# Altium PCB Main_PCB_v1.1.PcbDoc (part 2 of 2)
Units mil, origin at the board's own origin, x right, y up, seen from the top; angles counter-clockwise.
Board outline 2165.35 x 2283.47 mil, 2 copper layers (Top Layer, Bottom Layer), stack 61.811 mil thick; 55 components, 34 nets, 241 pads, 63 vias.
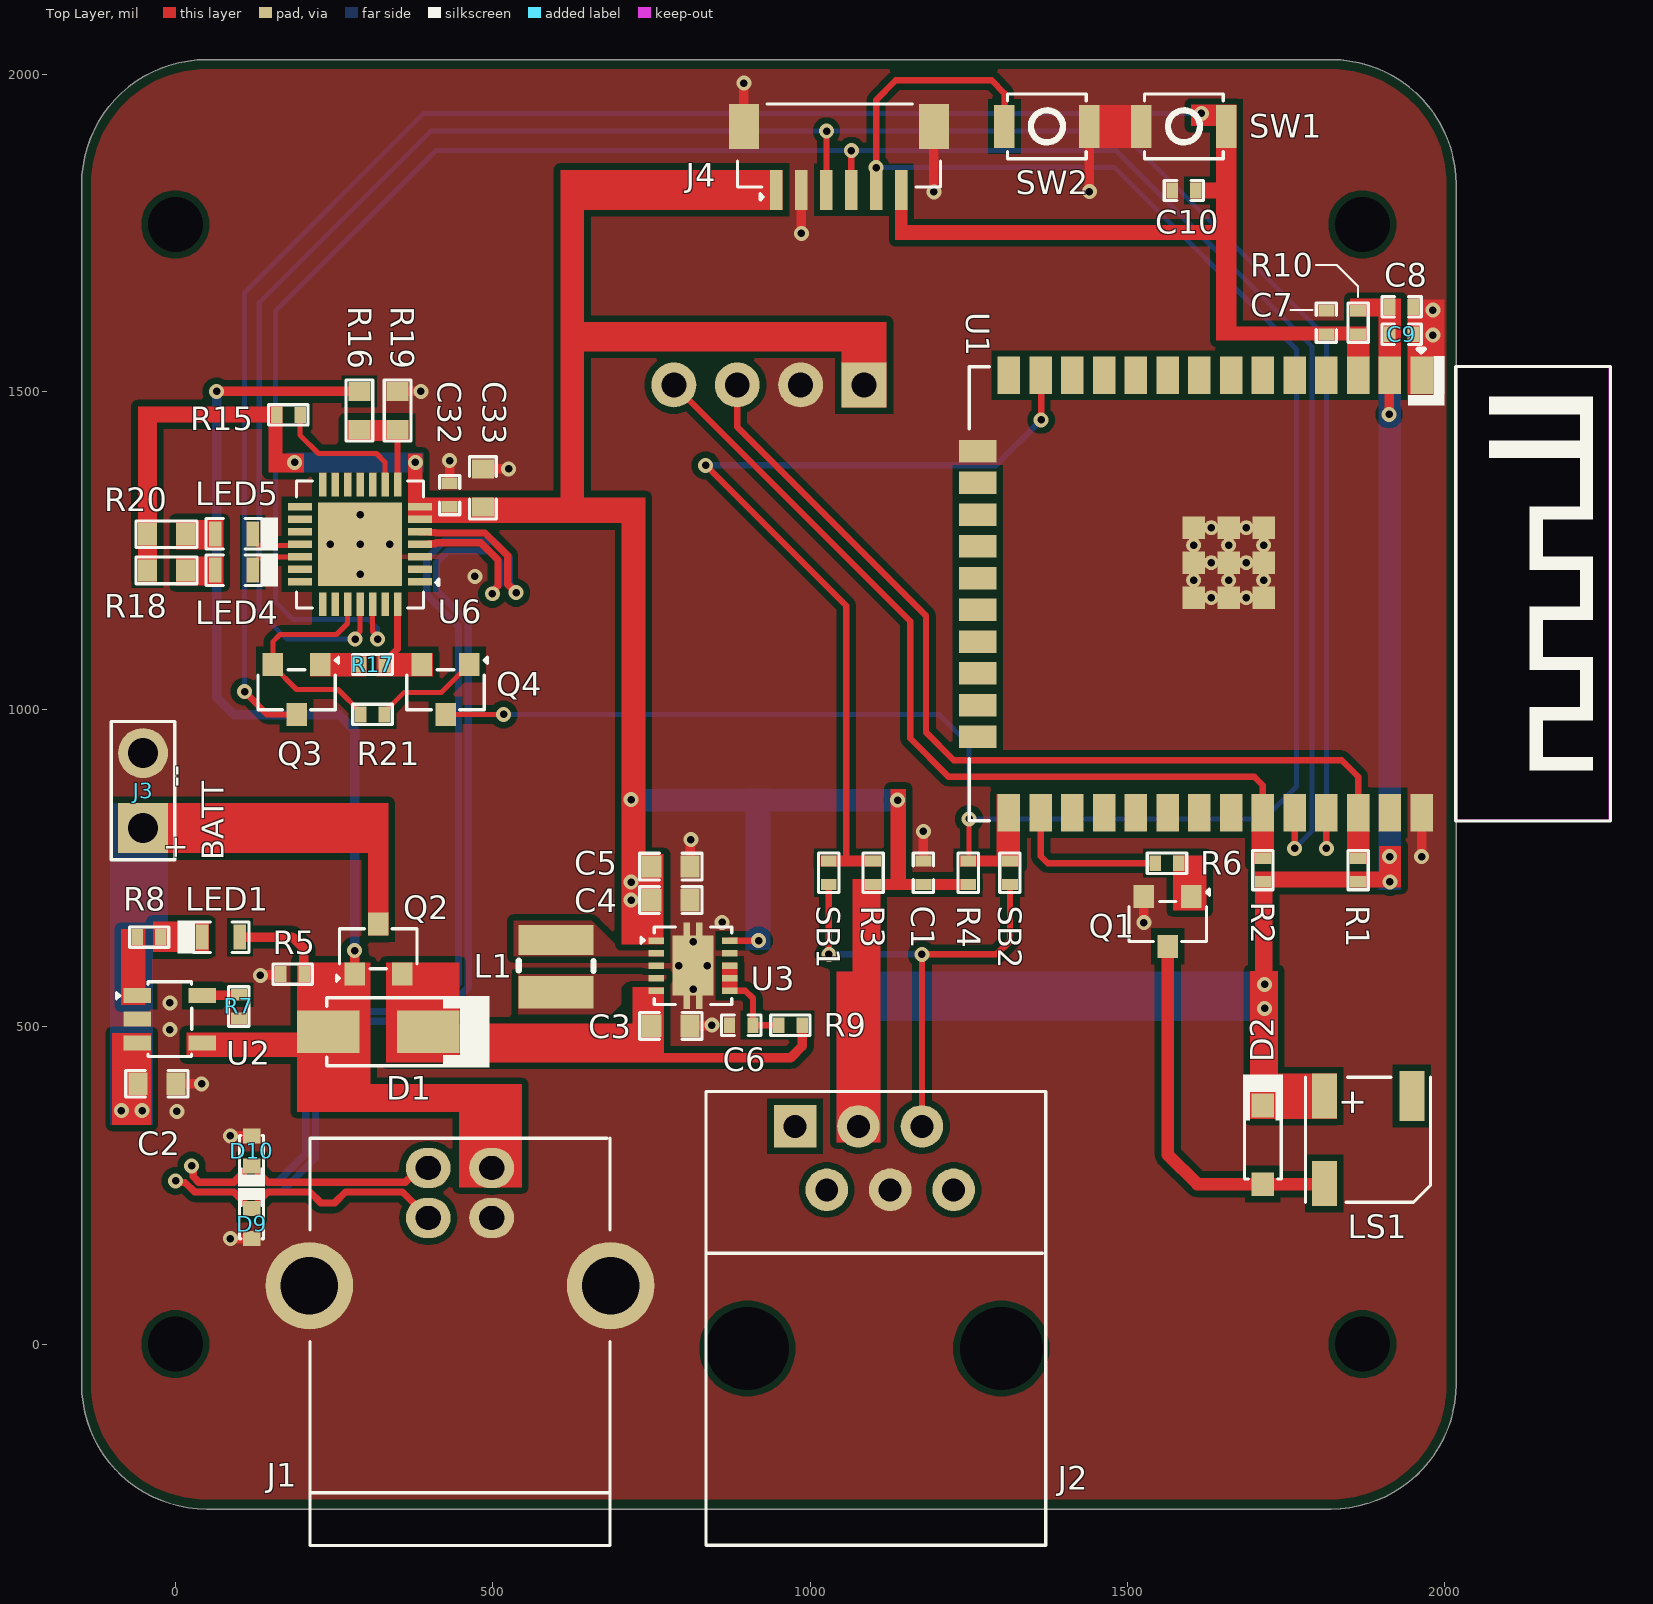
[diagram p0: Top Layer view]

## Part data (continued)
R18 R20: library part RC0603FR-07220RL, "RES SMD 220 OHM 1% 1/10W 0603", Case Code (Imperial)=0603, Case Code (Metric)=1608, LCSC Part Number=C107696, Manufacturer=Yageo, Max Operating Temperature=155°C, Max Power Dissipation=100mW, Min Operating Temperature=-55°C, Package Quantity=1, Supplier Part Number 1=311-220HRCT-ND, Temperature Coefficient=100ppm/°C, Tolerance=1%, Voltage Rating=50V, Case/Package=0603, ComponentLink1Description=http://www.yageo.com/documents/recent/PYu-RC_Group_51_RoHS_L_10.pdf?src-supplier=Digi-Key, ComponentLink1URL=http://www.yageo.com/documents/recent/PYu-RC_Group_51_RoHS_L_10.pdf?src-supplier=Digi-Key, ComponentLink2Description=http://www.farnell.com/datasheets/1868787.pdf?src-supplier=Element14, ComponentLink2URL=http://www.farnell.com/datasheets/1868787.pdf?src-supplier=Element14, Composition="Thick Film", Depth=0.8mm, Features="Moisture Resistant", Height=0.022inch, Item Type=Resistor, Lead Free="Lead Free", Length=1.6mm, Manufacturer Part Number=RC0603FR-07220RL, Military Standard=Not, Number of Pins=2, Number of Terminations=2, Packaging="Tape and Reel", Power Rating=100mW, Pricing 1="1=0.1, 10=0.023, 100=0.0094, 1000=0.00421, 2500=0.00366 (USD)", REACH SVHC="No SVHC", Resistance=220R, Stock 1=5843995, Supplier 1=Digi-Key, Termination=SMD/SMT, Voltage Rating (DC)=50V, Width=0.031inch
R19: library part RC0603FR-0747K5L, "RES 47.5K OHM 1% 1/10W 0603", Case Code (Imperial)=0603, Case Code (Metric)=1608, LCSC Part Number=C137715, Manufacturer=Yageo, Max Operating Temperature=155°C, Max Power Dissipation=100mW, Min Operating Temperature=-55°C, Package Quantity=5000, Resistance=47.5kR, Resistance Tolerance=1%, Resistor Type="Thick Film", Temperature Coefficient=100ppm/°C, Voltage Rating=50V, Case/Package=0603, Category="Chip SMD Resistors", ComponentLink1Description=https://datasheet.ciiva.com/11808/0900766b80f96399-11808343.pdf?src-supplier=RSComponents, ComponentLink1URL=https://datasheet.ciiva.com/11808/0900766b80f96399-11808343.pdf?src-supplier=RSComponents, ComponentLink2Description=https://datasheet.ciiva.com/2454/pyu-r-int-thick-7-2454790.pdf?src-supplier=Digi-Key, ComponentLink2URL=https://datasheet.ciiva.com/2454/pyu-r-int-thick-7-2454790.pdf?src-supplier=Digi-Key, ComponentLink3Description=https://datasheet.ciiva.com/2454/pyu-r-int-thick-7-2454791.pdf?src-supplier=Digi-Key, ComponentLink3URL=https://datasheet.ciiva.com/2454/pyu-r-int-thick-7-2454791.pdf?src-supplier=Digi-Key, ComponentLink4Description=https://datasheet.ciiva.com/2454/pyu-r-int-thick-7-2454789.pdf?src-supplier=Digi-Key, ComponentLink4URL=https://datasheet.ciiva.com/2454/pyu-r-int-thick-7-2454789.pdf?src-supplier=Digi-Key, ComponentLink5Description=https://datasheet.ciiva.com/12555/rc0603-272842-12555285.pdf?src-supplier=Mouser, ComponentLink5URL=https://datasheet.ciiva.com/12555/rc0603-272842-12555285.pdf?src-supplier=Mouser, ComponentLink6Description=https://datasheet.ciiva.com/15189/getdatasheetpartid-135115-15189741.pdf?src-supplier=Verical, ComponentLink6URL=https://datasheet.ciiva.com/15189/getdatasheetpartid-135115-15189741.pdf?src-supplier=Verical, Construction=Rectangular, Depth=0.8mm, Features="Moisture Resistant", Height=0.45mm, Item Type=Resistor, Lead Free="Lead Free", Length=1.6mm, Manufacturer Part Number=RC0603FR-0747K5L, Military Standard=Not, Number of Pins=2, Number of Terminations=2, Packaging="Tape and Reel", Power Rating=100mW, Pricing 1="5000=0.00133, 10000=0.00131, 20000=0.00127 (USD)", Reach SVHC Compliant=Yes, RoHS=Yes, RoHS Compliant=Yes, Series=RC, Size Code=0603, Stock 1=20000, Supplier 1=Avnet, Supplier Part Number 1=RC0603FR-0747K5L, Technology="THICK FILM", Termination=SMD/SMT, Tolerance=1%, Voltage Rating (DC)=50V, Width=0.031inch
SB1 SB2: "Solder Bridge ON", Item Type="Solder Bridge", Manufacturer Part Number="Solder Bridge 0402"
SW1 SW2: "SWITCH TACTILE SPST-NO 0.05A 12V", Contact Current Rating=50mA, Contact Resistance=100mR, Insulation Resistance=100MR, LCSC Part Number=C231329, Manufacturer=Omron, Max Operating Temperature=70°C, Max Voltage Rating (DC)=12V, Min Operating Temperature=-25°C, Operating Force=1.5N, Package Quantity=1, Ratings="Dust Proof,IP40", Supplier Part Number 1=SW1020DKR-ND, Actuator Length=0.4mm, Actuator Type=Standard, ComponentLink1Description=http://www.farnell.com/datasheets/60838.pdf?src-supplier=Farnell, ComponentLink1URL=http://www.farnell.com/datasheets/60838.pdf?src-supplier=Farnell, ComponentLink2Description=http://www.farnell.com/datasheets/60838.pdf?src-supplier=Element14, ComponentLink2URL=http://www.farnell.com/datasheets/60838.pdf?src-supplier=Element14, ComponentLink3Description=https://omronfs.omron.com/en_US/ecb/products/pdf/en-b3u.pdf?src-supplier=Digi-Key, ComponentLink3URL=https://omronfs.omron.com/en_US/ecb/products/pdf/en-b3u.pdf?src-supplier=Digi-Key, ComponentLink4Description=http://www.omron.com/ecb/products/pdf/en-b3u.pdf?src-supplier=Digi-Key, ComponentLink4URL=http://www.omron.com/ecb/products/pdf/en-b3u.pdf?src-supplier=Digi-Key, ComponentLink5Description=https://www.distrelec.biz/Web/Downloads/he/et/B3U_eng_datasheet.pdf?mime=application%2Fpdf&src-supplier=Distrelec, ComponentLink5URL=https://www.distrelec.biz/Web/Downloads/he/et/B3U_eng_datasheet.pdf?mime=application%2Fpdf&src-supplier=Distrelec, ComponentLink6Description=http://www.onlinecomponents.com/productFiles/mf-OM/en-b3u.pdf?src-supplier=Onlinecomponents.com, ComponentLink6URL=http://www.onlinecomponents.com/productFiles/mf-OM/en-b3u.pdf?src-supplier=Onlinecomponents.com, ComponentLink7Description=https://www.verical.com/server-webapp/html/getDatasheet?partID=552554&src-supplier=Verical, ComponentLink7URL=https://www.verical.com/server-webapp/html/getDatasheet?partID=552554&src-supplier=Verical, ComponentLink8Description=http://www.farnell.com/datasheets/1685550.pdf?src-supplier=Element14, ComponentLink8URL=http://www.farnell.com/datasheets/1685550.pdf?src-supplier=Element14, ComponentLink9Description=http://www.farnell.com/datasheets/2610940.pdf?src-supplier=Farnell, ComponentLink9URL=http://www.farnell.com/datasheets/2610940.pdf?src-supplier=Farnell, ComponentLink10Description=https://www.alliedelec.com/m/d/4c8a9ef82804fc3c241a13c1e298fd73.pdf?src-supplier=Allied+Electronics, ComponentLink10URL=https://www.alliedelec.com/m/d/4c8a9ef82804fc3c241a13c1e298fd73.pdf?src-supplier=Allied+Electronics, Contact Material=Silver, Current Rating=50mA, Depth=2.5mm, Electrical Life=200000Cycles, Height=1.2mm, Illumination Type=Non-Illuminated,Illuminated, Item Type=Switch, Lead Free="Lead Free", Length=4mm, Manufacturer Part Number=B3U-1000P, Max Current Rating=50mA, Mechanical Life=200000Cycles, Mount="Surface Mount", Orientation=Straight, Packaging="Tape and Reel", Pricing 1="1=1, 10=0.961, 25=0.9064, 50=0.7976, 100=0.7251, 250=0.68888, 500=0.67074, 1000=0.52571 (USD)", REACH SVHC=Unknown, Stock 1=116454, Supplier 1=Digi-Key, Switch Function=Off-Mom, Switch Travel=0.15mm, Termination=SMD/SMT, Throw Configuration=SPST, Voltage Rating (DC)=12V, Weight=0.000776oz, Width=3mm
U1: "RX TXRX MOD WIFI TRACE ANT SMD", Manufacturer="Espressif Systems", Supplier Part Number 1=1965-ESP32-WROOM-32E(4MB)CT-ND, Manufacturer Part Number=ESP32-WROOM-32E-N4, Pricing 1="1=3.00000 (USD)", RoHS=No, Supplier 1=Digi-Key
U2: "IC BATT CNTL LI-ION 1CEL SOT23-5", Battery Pack Voltage=4.2V, Case/Package=SOT-23, Drain to Source Resistance=350mR, LCSC Part Number=C424093, Manufacturer=Microchip, Max Charge Current=500mA, Max Operating Temperature=85°C, Max Output Voltage=4.5V, Max Power Dissipation=1.54W, Max Supply Voltage=6V, Min Operating Temperature=-40°C, Min Output Voltage=4.168V, Min Supply Voltage=3.75V, Supplier Part Number=7386360, Voltage Rating=4.534V, Category="Battery Management", ComponentLink1Description=https://datasheet.ciiva.com/22828/0900766b80d2b53a-22828876.pdf?src-supplier=Rs, ComponentLink1URL=https://datasheet.ciiva.com/22828/0900766b80d2b53a-22828876.pdf?src-supplier=Rs, ComponentLink2Description=https://datasheet.ciiva.com/26344/651521-da-01-en-contr-mcp73831t-2aci-ot-sot-23-5-mcp-26344458.pdf?src-supplier=Conrad, ComponentLink2URL=https://datasheet.ciiva.com/26344/651521-da-01-en-contr-mcp73831t-2aci-ot-sot-23-5-mcp-26344458.pdf?src-supplier=Conrad, ComponentLink3Description=https://datasheet.ciiva.com/1137/630369-1137803.pdf?src-supplier=Element14, ComponentLink3URL=https://datasheet.ciiva.com/1137/630369-1137803.pdf?src-supplier=Element14, ComponentLink4Description=https://datasheet.ciiva.com/28626/630369-28626439.pdf?src-supplier=Element14, ComponentLink4URL=https://datasheet.ciiva.com/28626/630369-28626439.pdf?src-supplier=Element14, ComponentLink5Description=https://datasheet.ciiva.com/46385/630369-46385324.pdf?src-supplier=Element14, ComponentLink5URL=https://datasheet.ciiva.com/46385/630369-46385324.pdf?src-supplier=Element14, ComponentLink6Description=https://datasheet.ciiva.com/1144/630369-1144461.pdf?src-supplier=Newark, ComponentLink6URL=https://datasheet.ciiva.com/1144/630369-1144461.pdf?src-supplier=Newark, Fault Protection="Over Voltage", Height=1.3mm, Item Type=IC, Lead Free="Lead Free", Length=3.1mm, Manufacturer Part Number=MCP73831T-2ACI/OT, Mounting Technology="Surface Mount", Number of Cells=1, Number of Channels=1, Number of Outputs=1, Output Current=500mA, Output Voltage=4.2V, Packaging="Tape and Reel", Pins=5, Pricing="5=0.708, 25=0.684, 100=0.664 (GBP)", Radiation Hardening=No, Reach SVHC Compliant=No, RoHS=Yes, RoHS Compliant=Yes, Series=-, Stock=95, Supplier=Rs, Termination=SMD/SMT, Weight=0.00709oz, Width=1.8mm
U3: "IC REG BUCK BST 3.3V 1.6A 10VSON", Case/Package=VSON, LCSC Part Number=C28060, Manufacturer="Texas Instruments", Max Operating Temperature=85°C, Max Output current=1.2A, Max Output Voltage=3.3V, Max Supply Voltage=5.5V, Min Input Voltage=1.8V, Min Operating Temperature=-40°C, Package Quantity=1, Quiescent Current=30uA, Switching Frequency=1.5MHz, ComponentLink1Description=https://datasheet.ciiva.com/2025/tps63001-2025809.pdf?src-supplier=Digikey, ComponentLink1URL=https://datasheet.ciiva.com/2025/tps63001-2025809.pdf?src-supplier=Digikey, ComponentLink2Description=https://datasheet.ciiva.com/3220/slvs520b-3220364.pdf?src-supplier=Avnet, ComponentLink2URL=https://datasheet.ciiva.com/3220/slvs520b-3220364.pdf?src-supplier=Avnet, ComponentLink3Description=https://datasheet.ciiva.com/15113/getdatasheetpartid-188339-15113751.pdf?src-supplier=Verical, ComponentLink3URL=https://datasheet.ciiva.com/15113/getdatasheetpartid-188339-15113751.pdf?src-supplier=Verical, ComponentLink4Description=https://datasheet.ciiva.com/41462/001014938-da-01-en-ic-reg-buck-bst-tps63001drcr-vson-10-tid-41462783.pdf?src-supplier=Conrad, ComponentLink4URL=https://datasheet.ciiva.com/41462/001014938-da-01-en-ic-reg-buck-bst-tps63001drcr-vson-10-tid-41462783.pdf?src-supplier=Conrad, ComponentLink5Description=https://datasheet.ciiva.com/7994/1831174-7994044.pdf?src-supplier=Element14, ComponentLink5URL=https://datasheet.ciiva.com/7994/1831174-7994044.pdf?src-supplier=Element14, ComponentLink6Description=https://datasheet.ciiva.com/46394/1854797-46394566.pdf?src-supplier=Element14, ComponentLink6URL=https://datasheet.ciiva.com/46394/1854797-46394566.pdf?src-supplier=Element14, ComponentLink7Description=https://datasheet.ciiva.com/2025/tps63001-2025813.pdf?src-supplier=Digikey, ComponentLink7URL=https://datasheet.ciiva.com/2025/tps63001-2025813.pdf?src-supplier=Digikey, ComponentLink8Description=https://datasheet.ciiva.com/2025/tps63001-2025812.pdf?src-supplier=Digikey, ComponentLink8URL=https://datasheet.ciiva.com/2025/tps63001-2025812.pdf?src-supplier=Digikey, Efficiency=96%, Height=1mm, Item Type=IC, Lead Free="Lead Free", Length=3mm, Manufacturer Part Number=TPS63001DRCR, Max Duty Cycle=100%, Min Output Voltage=3.3V, Nominal Output Voltage=3.3V, Number of Channels=1NUMBER, Number of Outputs=1, Operating Supply Voltage=5.5V, Output Current=1.2A, Output Type=Fixed, Output Voltage=3.3V, Packaging="Tape and Reel", Pins=10, Pricing="1=2.03, 10=1.53, 50=1.41, 100=1.27, 1000=1.14, 10000=1.02 (USD)", Radiation Hardening=No, Reach SVHC Compliant=No, RoHS=Yes, RoHS Compliant=Yes, Series=-, Stock=5773, Supplier=Mouser, Synchronous Rectifier=Yes, Thickness=900um, Topology=Buck-Boost, Weight=0.000921oz, Width=3mm
U6: "Full Speed USB to UART Bridge USB 2.0 3.3V T/R Automotive 28-Pin QFN EP", Case/Package=QFN, Manufacturer="Silicon Labs", Max Operating Temperature=85°C, Min Operating Temperature=-40°C, Operating Supply Current=9.5mA, Category="USB Interface ICs", ComponentLink1Description=https://www.silabs.com/documents/public/data-sheets/cp2102n-datasheet.pdf?src-supplier=Digikey, ComponentLink1URL=https://www.silabs.com/documents/public/data-sheets/cp2102n-datasheet.pdf?src-supplier=Digikey, ComponentLink2Description=https://4donline.ihs.com/images/VipMasterIC/IC/SILC/SILC-S-A0007770867/SILC-S-A0007770867-1.pdf?hkey=6D3A4C79FDBF58556ACFDE234799DDF0&src-supplier=Farnell, ComponentLink2URL=https://4donline.ihs.com/images/VipMasterIC/IC/SILC/SILC-S-A0007770867/SILC-S-A0007770867-1.pdf?hkey=6D3A4C79FDBF58556ACFDE234799DDF0&src-supplier=Farnell, Interface=UART, Manufacturer Part Number=CP2102N-A02-GQFN28R, Packaging="Cut Tape", Pricing="1500=2.369, 3000=2.265 (USD)", RoHS=Yes, Series=USBXpress™, Stock=16500, Supplier="Arrow Electronics", Supplier Part Number=CP2102N-A02-GQFN28R

## Free pads (board coordinates)
  round 0 hole 86.61 unplated: 2(0,1763.78) 2(1870.08,1763.78) 3(0,0) 3(1870.08,0)

## Via types
v1: diameter 23.62, hole 11.81, Top Layer to Bottom Layer, 63 vias

## Nets (pads, with @x,y where several pads share a name; then routed paths per layer and width w, separated by ;. In a path a pad name is that pad's centre, name@x,y a point inside that pad or via, vN(x,y) a via of type N, cw(c..) or ccw(c..) an arc to the next point about the centre after c; other vN are vias at no path point)
3V3: C1.2 C4.2 C5.2 C8.2 C9.2 C32.1 C33.2 D2.2 J2.3 J4.1 LS1.1 OLED1.1 R1.1 R2.1 R3.1 R4.1 R10.2 R15.1 R18.2 R20.2 U1.2 U3.1 U3.10 U6.6 U6.7 | length 107.9
  Top Layer w10: U3.10 v1(919.02,635.46)
  Top Layer w15: v1(1912.12,1464.75) 1912.71,1465.34 1912.71,1524.49 1912.12,1525.08 U1.2
  other v1: 1716,529 1716,566.88 717.91,699.3 717.91,727.87 1913.32,728.27 1913,767.88 1138,856.88 717.91,857.88 187.81,1389.26 378.06,1389.26
DTR: Q4.2 R17.1 U6.28 | length 103.4
  Top Layer w11.41: R17.1 329.09,1074.14 350.06,1095.1 U6.28
EN: C7.2 C10.2 J4.6 Q3.3 R10.1 SW1.1 U1.3 | length 2356.8
  Top Layer w10: v1@104.13,1032.79 145.02,991.9 Q3.3
  Bottom Layer w8: v1(109.02,1027.9) 109.02,1656.48 391.41,1938.88 v1(1616.43,1938.88)
GND: C1.1 C2.1 C3.1 C4.1 C5.1 C6.1 C7.1 C8.1 C9.1 C10.1 C32.2 C33.1 D9.1 D10.1 J1.4 J1.5 J1.6 J2.4 J3.2 J4.2 J4.MP1 J4.MP2 OLED1.2 Q1.2 R5.1 R7.2 R19.1 SW1.2 SW2.2 U1.1 U1.15 U1.38 U1.39 U1.39_10 U1.39_11 U1.39_12 U1.39_13 U1.39_14 U1.39_15 U1.39_16 U1.39_17 U1.39_18 U1.39_19 U1.39_20 U1.39_21 U1.40 U1.41 U1.42 U1.43 U1.44 U1.45 U1.46 U1.47 U2.2 U3.3 U3.9 U3.11 U6.3 U6.29 | length 833.5
  Top Layer w15: C2.1 v1(41.39,410.09) ; v1(86.67,166.26) D9.1 ; v1(86.67,328.13) D10.1 ; v1(134,580.88) 134.99,581.87 165.24,581.87 R5.1 ; R19.1 350.09,1500.92 386.96,1500.92 v1(387,1500.88) ; C32.2@431.99,1357.15 v1(432,1391.88) ; C33.1@486.48,1378.91 v1(525,1378.88) ; C3.1 811.02,501.9 844.67,501.9 v1(845.17,502.4) ; C5.1 811.27,753.16 811.27,794.13 v1(812.03,794.88) ; J4.MP1 v1(895.79,1986.65) ; v1(986.34,1749.71) J4.2 ; C1.1 v1(1178.58,807.77) ; v1(1195,1815.26) J4.MP2 ; v1(1439.98,1815.75) SW2.2 ; v1@1521.52,663.85 v1(1525.81,663.85) Q1.2 ; v1(1963.32,767.88) U1.38
  other v1: 2.36,366.51 -8.7,495.44 -8.7,537.49 861.44,664.31 471.94,1209.47 291,1212.88 244,1259.88 291,1259.88 338,1259.88 291,1306.88 1981.03,1589.69 1981.03,1629.06
GPIO#: J2.5 SB1.1 SB2.2 | length 764.2
  Top Layer w10: SB1.1 1029.41,724.05 v1(1029.45,613.92) v1(1029.45,613.92) ; J2.5 v1(1176.21,613.92) 1293.63,613.92 1314.82,635.11 SB2.2
  Bottom Layer w10: v1(1029.45,613.92) v1(1176.21,613.92)
IO0: J4.5 Q4.3 R4.2 SB2.1 SW2.1 U1.25 | length 3451.6
  Top Layer w8: Q4.3 v1(517,991.88) ; R4.2 1250.63,762.65 v1(1250.63,827.46)
  Top Layer w10: v1(1104.01,1853.35) 1104.01,1959.89 1135,1990.88 1286,1990.88 1306.12,1970.76 SW2.1 ; J4.5 J4.5@1104.45,1827.21
  Top Layer w15: v1(1104.01,1853.35) 1104.23,1853.13 1104.23,1827.44 J4.5@1104.46,1827.21
  Bottom Layer w8: v1(517,991.88) 1202.95,991.88 1250.63,944.2 v1(1250.63,827.46) 1715.01,827.46 1766.18,878.63 1766.18,1566.93 1479.75,1853.35 v1(1104.01,1853.35)
IO4!: R6.1 U1.26 | length 253.7
  Top Layer w10: U1.26 1363.32,768.57 1374.29,757.59 R6.1
NetC3_2: C3.2 D1.1 Q2.2 R9.2 U3.5 | length 293.1
  Top Layer w15: 746.12,451.43 969.71,451.43 987.52,469.24 R9.2@987.52,492.4 ; 751.92,470.19 C3.2@751.92,491.4
NetC6_2: C6.2 R9.1 U3.6 U3.7 U3.8 | length 124.1
  Top Layer w10: U3.6 898,556.72 910.02,544.69 C6.2 R9.1
NetD2_1: D2.1 LS1.2 Q1.3 | length 594.7
  Top Layer w20: Q1.3 1563.21,298.79 1610.01,251.99 D2.1 1808.99,251.99 LS1.2
NetL1_1: L1.1 U3.4
NetL1_2: L1.2 U3.2
NetLED1_2: LED1.2 R8.1
NetLED4_1: LED4.1 R18.1
NetLED4_2: LED4.2 U6.19 | length 89
  Top Layer w8: LED4.2 122.02,1229 133.22,1240.2 U6.19
NetLED5_1: LED5.1 R20.1
NetLED5_2: LED5.2 U6.18 | length 88.4
  Top Layer w8: LED5.2 122.02,1266.58 130.27,1258.32 194.95,1258.32 U6.18
NetQ1_1: Q1.1 R6.2
NetQ3_1: Q3.1 R17.2
NetQ4_1: Q4.1 R21.2 | length 169.8
  Top Layer w8: R21.2 329.09,995.4 360.46,1026.77 419.16,1026.77 448.92,1056.53 450.89,1056.53 463.03,1068.68 Q4.1
NetR3_2: R3.2 SB1.2 U1.13 | length 1383.7
  Top Layer w10: v1(835.55,1384.29) 1056.87,1162.97 1056.87,765.09 1060.86,761.09 R3.2 ; U1.13 1364,1525.59 v1(1364,1455.88)
  Bottom Layer w10: v1(835.55,1384.29) 1292.41,1384.29 v1(1364,1455.88)
NetR7_1: R7.1 U2.5 | length 60.5
  Top Layer w15: U2.5 43.02,549.85 R7.1@102.74,549.85
NetR8_2: R8.2 U2.1
NetR15_2: R15.2 U6.9 | length 218.4
  Top Layer w8: R15.2 196.5,1431.88 225.5,1402.88 316.74,1402.88 330.37,1389.26 U6.9
NetR16_2: R16.2 R19.2 U6.8 | length 86.6
  Top Layer w10: U6.8 R19.2
RTS: Q3.2 R21.1 U6.24 | length 369.9
  Top Layer w8: U6.24 271.31,1135.29 253.91,1117.88 165,1117.88 153.6,1106.48 Q3.2 153.6,1068.68 191,1031.27 256.22,1031.27 292.09,995.4 R21.1
RXD: J4.3 U1.35 U6.25 | length 3595.5
  Top Layer w8: v1(283.09,1110.57) 283.09,1114.79 291,1122.7 U6.25
  Top Layer w10: J4.3 1025.85,1818.62 1025.85,1910.74 v1(1026,1910.88) ; v1(1813.32,780.88) U1.35
  Bottom Layer w8: v1(283.09,1110.57) 175.33,1110.57 132.23,1153.66 132.23,1640.7 402.41,1910.88 v1(1026,1910.88) 1488.45,1910.88 1813.32,1586.01 v1(1813.32,780.88)
RXD0: J4.4 U1.34 U6.26 | length 3497.5
  Top Layer w8: U6.26 310.68,1122.7 318.59,1114.79 v1(318.59,1110.57)
  Top Layer w10: J4.4 v1(1065.08,1880.39) ; v1(1763.32,780.88) U1.34
  Bottom Layer w8: v1(318.59,1110.57) 318.07,1111.09 318.07,1127.97 304.72,1141.32 185.85,1141.32 157.53,1169.63 157.53,1627 410.92,1880.39 v1(1065.08,1880.39) 1481.88,1880.39 1791,1571.27 1791,808.56 v1(1763.32,780.88)
SCK_: OLED1.3 R1.2 U1.36 | length 1436.8
  Top Layer w10: OLED1.3 885.21,1444.9 1182.57,1147.54 1182.57,963.77 1226.46,919.88 1837.34,919.88 1863.32,893.91 U1.36
SDA_: OLED1.4 R2.2 U1.33 | length 1340.5
  Top Layer w10: OLED1.4 1157.63,1138.67 1157.63,954.39 1218.1,893.91 1699.97,893.91 1713.32,880.57 U1.33
USB_D_N: D10.2 J1.2 U6.5 | length 2206.4
  Top Layer w11.41: v1(25.68,280.88) 28.02,278.55 28.02,263.92 37.04,254.9 92.05,254.9 118.03,280.88 121.97,280.88 128.07,274.78 128.07,272.81 145.98,254.9 362.01,254.9 384.63,277.52 J1.2 ; U6.5 398.28,1279.57 399.36,1278.49 409.45,1278.49 410,1277.95 487.66,1277.95 523.75,1241.85 523.75,1196.88 536.73,1183.91 v1(536.73,1183.69)
  Bottom Layer w11.41: v1(25.68,280.88) 28.02,278.55 28.02,263.92 37.04,254.9 160.68,254.9 205.57,299.79 205.57,459.45 270.28,524.16 401.54,524.16 446,568.62 446,1130.56 396.03,1180.53 396.03,1237.8 422.92,1264.7 500.91,1264.7 513,1252.6 526.62,1238.99 526.62,1196.48 536.73,1186.38 v1(536.73,1183.69)
USB_D_P: D9.2 J1.3 U6.4 | length 2206
  Top Layer w11.41: v1(0.5,257.11) 2.84,254.77 15.37,254.77 30.66,239.49 92.05,239.49 118.03,213.5 121.97,213.5 128.07,219.61 128.07,221.58 145.98,239.49 212.2,239.49 229.2,222.49 250.94,222.49 267.94,239.49 357.8,239.49 J1.3 J1.3 ; U6.4 398.28,1259.88 399.36,1260.95 409.45,1260.95 411.03,1262.53 481.28,1262.53 508.34,1235.47 508.34,1194.43 499.32,1185.41 v1(499.32,1182.1)
  Bottom Layer w11.41: v1(0.5,257.11) 2.84,254.77 15.37,254.77 30.66,239.49 167.06,239.49 220.98,293.4 220.98,453.07 276.66,508.75 407.92,508.75 461.41,562.24 461.41,1136.94 411.44,1186.92 411.44,1231.42 429.31,1249.29 494.52,1249.29 511.21,1232.6 511.21,1197.29 499.32,1185.41 v1(499.32,1182.1)
VBAT: C2.2 J3.1 Q2.3 U2.3 | length 63.5
  Top Layer w15: C2.2@-62.17,407.81 -59.52,410.46 C2.2 ; C2.2@-61.79,421.59 -50.24,410.04 v1@-50.24,367.71 ; U2.3 U2.3@-59.52,474.12
  other v1: -85.14,367.71 -52.24,367.71
VBUS: D1.2 J1.1 LED1.1 Q2.1 R5.2 R16.1 U2.4 | length 1920.9
  Top Layer w15: v1(65,1500.88) R16.1 ; LED1.1 184.38,641.09 202.49,622.98 R5.2@202.49,583.61 ; D1.2 240.94,407.08 267.94,380.09 476.21,380.09 498.43,357.87 J1.1 ; Q2.1 v1(282.28,619.79)
  Bottom Layer w15: v1(65,1500.88) 65,1019.07 92.53,991.55 258.24,991.55 282.28,967.51 v1(282.28,619.79)
pads on no net: J2.1 J2.2 J2.6 J2.MH LS1.3 U1.4 U1.5 U1.6 U1.7 U1.8 U1.9 U1.10 U1.11 U1.12 U1.14 U1.16 U1.17 U1.18 U1.19 U1.20 U1.21 U1.22 U1.23 U1.24 U1.27 U1.28 U1.29 U1.30 U1.31 U1.32 U1.37 U6.1 U6.2 U6.10 U6.11 U6.12 U6.13 U6.14 U6.15 U6.16 U6.17 U6.20 U6.21 U6.22 U6.23 U6.27

## Polygon pours and split planes (outlines as drawn)
GND on Top Layer "NONET_L01_P-001" (solid, remove dead copper, pour order 4): -147.64,-63.06 -147.64,1807.02 cw(c59.05,1816.86) 49.21,2023.55 1820.87,2023.55 cw(c1811.02,1816.86) 2017.72,1807.02 2017.72,-63.06 cw(c1801.18,-43.38) 1781.5,-259.91 49.21,-259.91 cw(c49.21,-63.06)
NetL1_1 on Top Layer "NONET_L01_P-001" (solid, pour order 6): 769.71,571.28 703.41,571.28 657.21,525.09 532.88,525.09 532.88,581.52 661.25,581.52 769.71,581.52
NetL1_2 on Top Layer "NONET_L01_P-001" (solid, pour order 5): 769.71,620.89 702.41,620.89 656.21,667.09 532.88,667.09 532.88,610.65 661.25,610.65 769.71,610.65
NetL1_1 on Top Layer "NONET_L01_P-001" (solid, pour order 2): 779.45,570.81 779.45,582.63 661.64,582.63 540.46,582.63 540.46,519.31 686.63,519.31 702.82,535.5 702.82,562.5 711.13,570.81
GND on Bottom Layer "NONET_L01_P-001" (solid, remove dead copper, pour order 3): 2017.72,-63.06 2017.72,1807.02 ccw(c1811.02,1816.86) 1820.87,2023.55 49.21,2023.55 ccw(c59.06,1816.86) -147.64,1807.02 -147.64,-63.06 ccw(c68.9,-43.38) 88.58,-259.91 1820.87,-259.91 ccw(c1820.87,-63.06)

## Other copper
Top Layer:
  rectangle net 3V3: 1693.31,355 1829.78,426.33
  region net 3V3: 740.6,1333.88 703.1,1333.88 703.1,630.34 740.6,630.34
  rectangle net 3V3: 606.5,1293.34 644,1849.97
  rectangle net 3V3: 1896.23,719.27 1931.03,784.88
  rectangle net 3V3: 1127,715.88 1151,874.88
  rectangle net 3V3: 366.79,1293.35 389.42,1402.88
  rectangle net 3V3: 147,1373.07 203,1402.88
  rectangle net 3V3: 147,1373.07 168.5,1479.88
  rectangle net 3V3: 1895.6,1496.75 1931,1646.88
  rectangle net 3V3: 1700.51,719.27 1931.03,744.55
  rectangle net 3V3: 1693.31,357.31 1736.85,587.76
  rectangle net 3V3: 1700.51,509.34 1728.48,744.55
  rectangle net VBAT: 303.54,643.5 335.82,852.29
  rectangle net VBAT: -90.26,773.55 335.82,852.29
  rectangle net 3V3: 606.5,1786.98 956.81,1849.97
  rectangle net 3V3: 1049.78,1475.65 1120.65,1609.88
  rectangle net 3V3: 606.5,1563.88 1120.65,1609.88
  rectangle net NetR16_2: 267.58,1422.96 367.56,1455.96
  rectangle net 3V3: -59,1451.88 168.5,1477.15
  rectangle net 3V3: -59,1201.38 -29,1477.15
  rectangle net IO0: 1293.63,752.09 1331.03,866.83
  rectangle net EN: 1599.93,1918.88 1671.75,1952.62
  rectangle net SDA_: 1695.6,756.27 1731.03,866.83
  rectangle net SCK_: 1845.6,756.27 1881.03,866.83
  rectangle net DTR: 317.08,1051.88 405.92,1088.75
  rectangle net NetQ3_1: 212.26,1051.88 301.09,1088.75
  rectangle net 3V3: 366.79,1293.35 740.6,1333.88
  rectangle net NetLED5_1: 1,1252.21 75.49,1297.94
  rectangle net NetLED4_1: 1,1195.15 75.49,1240.88
  rectangle net EN: 1134,1739.02 1153.66,1849.97
  rectangle net EN: 1135,1739.02 1672,1762.88
  rectangle net EN: 1598.43,1804.88 1672,1829.88
  rectangle net EN: 1639.72,1581.88 1672,1952.24
  rectangle net GND: 1423.84,1884.52 1538.14,1952.24
  rectangle net GND: 1941.43,1496.75 1999.64,1645.99
  rectangle net EN: 1845.6,1496.75 1881,1602.88
  rectangle net EN: 1639.72,1580.69 1876.04,1602.88
  rectangle net 3V3: 1850.82,1618.88 1926.03,1646.88
  rectangle net IO0: 1235.93,752.09 1331,770.09
  rectangle net NetC3_2: 332,443.89 769.71,504.71
  rectangle net 3V3: 702.82,629.88 769.29,771.88
  rectangle net 3V3: 1067,343.09 1110.54,733.09
  rectangle net 3V3: 1086.06,715.09 1261.58,733.09
  rectangle net NetC6_2: 861.44,551.6 885.85,601.2
  rectangle net NetC3_2: 720.13,480.4 769.71,562.32
  rectangle net VBUS: 191.73,365.89 307.21,601.09
  rectangle net VBUS: 191.73,365.89 546.05,409.42
  rectangle net VBUS: 446.88,247.07 546.05,409.42
  rectangle net 3V3: 1041.68,317.88 1110.54,586.88
  rectangle net NetQ1_1: 1571.75,683.09 1624.21,770.09
  region net NetC3_2: 447.63,601.09 332.15,601.09 332.15,452.24 447.63,452.24
  rectangle net NetR3_2: 1016.22,752.09 1111.71,770.09
  rectangle net VBUS: 17.21,452.24 306.68,491.09
  rectangle net VBUS: 191.73,452.24 307.21,601.09
  rectangle net NetLED1_2: -35.31,617.51 52.69,665.51
  rectangle net NetR8_2: -85.61,534.09 -47.14,653.59
  rectangle net VBAT: -99.43,345.53 -37.79,490.09
Bottom Layer:
  rectangle net 3V3: 898,620.89 937.49,875.04
  rectangle net 3V3: 702.82,838.88 1151,874.88
  rectangle net 3V3: 175,1373.07 392,1404.88
  rectangle net 3V3: 1895.6,715.77 1931.03,1496.75
  rectangle net VBAT: -103,652.96 -11.52,852.29
  rectangle net 3V3: 1041.68,509.34 1736.85,586.88
  rectangle net 3V3: 1041.68,317.88 1110.54,586.88
  rectangle net VBAT: -103.16,345.53 -35.04,682.88

## Silkscreen, mask and mechanical layers (free items; w line width, h text height)
Top Overlay:
  lines w3.5: 1756.71,1629.06 1791,1629.06 ; 1797.32,1699.88 1829.6,1699.88 1863.32,1666.17 1863.32,1649.89
  text "+     -- / BATT" at 88,761.88 h60 r90
Board Outline:
  lines w10: -147.64,1826.7 cw(c49.21,1826.7) 49.21,2023.55 1820.87,2023.55 cw(c1820.87,1826.7) 2017.71,1826.7 2017.72,-62.97 cw(c1820.87,-62.97) 1820.87,-259.81 1820.77,-259.91 49.12,-259.82 cw(c49.12,-63.06) -147.64,-63.06 -147.64,1826.9

## Dimensions
-147.64,1826.9 to 2017.72,1826.7 on Dimension
1820.87,2023.55 to 1820.87,-259.81 on Dimension

## Text inside footprints (layer, text, board x,y; h text height)
LS1: Top Overlay "+" at 1837.9,403.1 h39.37 r270
OLED1: Bottom Overlay "VCC" at 1112.21,1429.09 h19.68; Bottom Overlay "GND" at 1005.27,1429.09 h19.68; Bottom Overlay "SCK" at 905.27,1429.09 h19.68; Bottom Overlay "SDA" at 809.21,1429.09 h19.68